# Altium PCB NB3000XN.PcbDoc (part 16 of 71)
Units mil, origin at the board's own origin, x right, y up, seen from the top; angles counter-clockwise.
Board outline 9527.56 x 6929.77 mil, 6 copper layers (Top Layer, GND+SHIELD, MidLayer1, MidLayer2, P2 - 3V3+5V0, Bottom Layer), stack 62.375 mil thick; 832 components, 1027 nets, 4655 pads, 4981 vias.
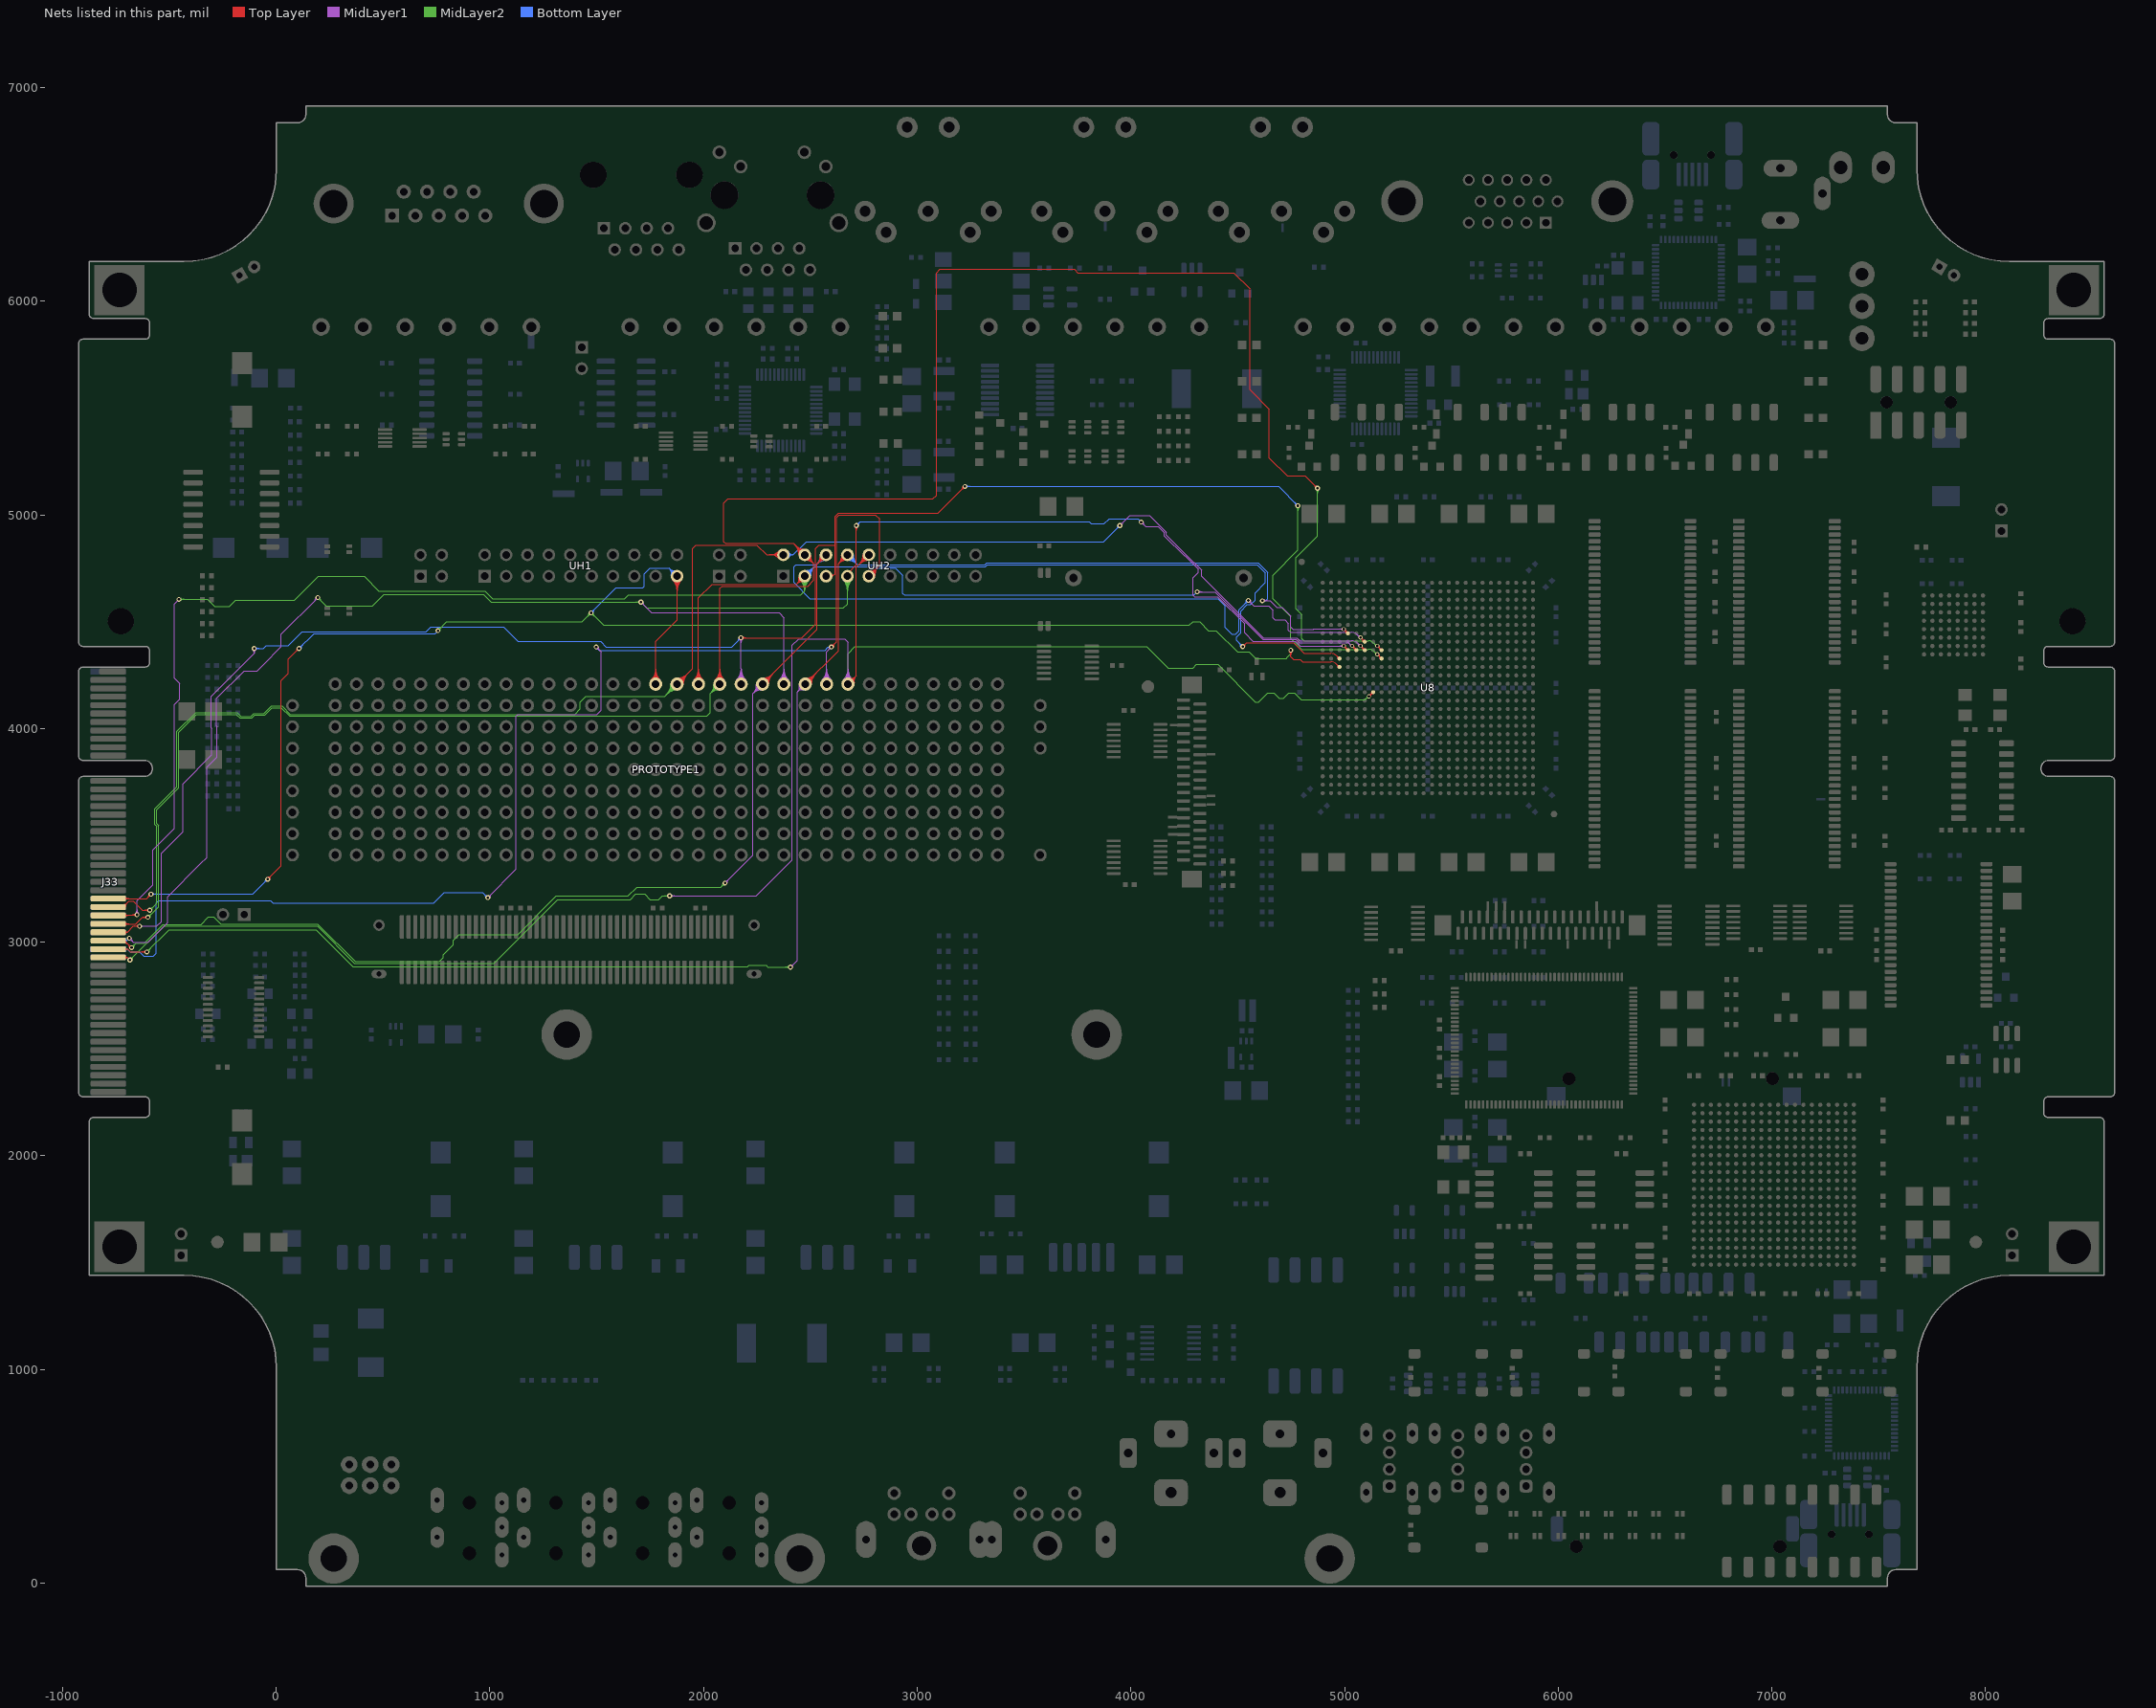
[diagram p20: the nets of this part, all layers, seen from the top]

## Via types
v1: diameter 23, hole 11.81, Top Layer to Bottom Layer, 3672 vias
v2: diameter 26, hole 11.81, Top Layer to Bottom Layer, 461 vias
v3: diameter 19, hole 11.81, Top Layer to Bottom Layer, tented both sides, 396 vias
v4: diameter 23.62, hole 11.81, Top Layer to Bottom Layer, 288 vias
v5: diameter 20, hole 11.81, Top Layer to Bottom Layer, 91 vias
v6: diameter 23, hole 11.81, Top Layer to Bottom Layer, tented both sides, 50 vias
v7: diameter 31, hole 11.81, Top Layer to Bottom Layer, 15 vias
v8: diameter 27.56, hole 11.81, Top Layer to Bottom Layer, tented both sides, 4 vias
v9: diameter 29, hole 11.81, Top Layer to Bottom Layer, 3 vias
v10: diameter 21, hole 11.81, Top Layer to Bottom Layer, 1 vias

## Nets (pads, with @x,y where several pads share a name; then routed paths per layer and width w, separated by ;. In a path a pad name is that pad's centre, name@x,y a point inside that pad or via, vN(x,y) a via of type N, cw(c..) or ccw(c..) an arc to the next point about the centre after c; other vN are vias at no path point) (continued)
ATE.UIO.IO17: J33.A26 PROTOTYPE1.H16 U8.L3 UH1.19 | length 9788.4
  Top Layer w4: J33.A26@-785.98,3204.04 -607.48,3204.04 v1(-586.48,3225.04) ; J33.A26@-711.58,3198.54 cw(c-698.3,3185.26) -698.3,3204.04 cw(c-698.3,3222.82) J33.A26@-711.58,3209.54 ; J33.A26@-708.76,3195.71 cw(c-688.65,3175.6) -688.65,3204.04 cw(c-688.65,3232.48) J33.A26@-708.76,3212.37 ; v1@-595.98,3225.04 cw(c-618.91,3225.04) -602.69,3208.82 cw(c-586.48,3192.61) v1@-586.48,3215.54 ; v1@-591.98,3225.04 cw(c-605.25,3225.04) -595.87,3215.65 cw(c-586.48,3206.26) v1@-586.48,3219.54 ; v1(-40,3295) 23.52,3358.52 23.52,4225.04 ; v1@-40,3300.5 ccw(c-40,3313.78) -30.61,3304.39 ccw(c-21.22,3295) v1@-34.5,3295 ; v1@-40,3304.5 ccw(c-40,3327.43) -23.78,3311.22 ccw(c-7.57,3295) v1@-30.5,3295 ; 43.96,4245.48 23.52,4225.04 ; v1@97.36,4375.04 cw(c74.42,4375.04) 90.64,4358.82 cw(c106.86,4342.61) v1@106.86,4365.54 ; v1@101.36,4375.04 cw(c88.08,4375.04) 97.47,4365.65 cw(c106.86,4356.26) v1@106.86,4369.54 ; v1(106.86,4375.04) 56.86,4325.04 56.86,4258.37 23.52,4225.04 ; PROTOTYPE1.H16@1755.62,4228.74 ccw(c1706.11,4278.25) 1776.12,4278.25 ccw(c1846.13,4278.25) PROTOTYPE1.H16@1796.63,4228.74 ; PROTOTYPE1.H16@1758.44,4225.91 ccw(c1715.77,4268.59) 1776.12,4268.59 ccw(c1836.48,4268.59) PROTOTYPE1.H16@1793.8,4225.91 ; PROTOTYPE1.H16@1761.27,4223.08 ccw(c1725.42,4258.93) 1776.12,4258.93 ccw(c1826.82,4258.93) PROTOTYPE1.H16@1790.97,4223.08 ; PROTOTYPE1.H16@1764.1,4220.26 ccw(c1735.08,4249.28) 1776.12,4249.28 ccw(c1817.16,4249.28) PROTOTYPE1.H16@1788.14,4220.26 ; PROTOTYPE1.H16@1766.93,4217.43 ccw(c1744.74,4239.62) 1776.12,4239.62 ccw(c1807.51,4239.62) PROTOTYPE1.H16@1785.31,4217.43 ; PROTOTYPE1.H16@1776.12,4208.23 1776.12,4408.37 1876.12,4508.37 UH1.19@1876.12,4713.23 ; UH1.19@1856.66,4693.77 cw(c1809.66,4646.78) 1876.12,4646.78 cw(c1942.58,4646.78) UH1.19@1895.59,4693.77 ; UH1.19@1859.48,4696.6 cw(c1819.32,4656.43) 1876.12,4656.43 cw(c1932.92,4656.43) UH1.19@1892.76,4696.6 ; UH1.19@1862.31,4699.43 cw(c1828.98,4666.09) 1876.12,4666.09 cw(c1923.26,4666.09) UH1.19@1889.93,4699.43 ; UH1.19@1865.14,4702.26 cw(c1838.63,4675.75) 1876.12,4675.75 cw(c1913.61,4675.75) UH1.19@1887.1,4702.26 ; v1@4741.81,4359.99 cw(c4725.59,4343.77) 4748.52,4343.77 cw(c4771.46,4343.77) v1@4755.24,4359.99 ; v1@4744.64,4362.82 cw(c4735.25,4353.43) 4748.52,4353.43 cw(c4761.8,4353.43) v1@4752.41,4362.82 ; v1@4755,4366.71 v1(4748.52,4366.71) 4748.52,4336.48 4761.6,4323.4 4792.92,4323.4 4804.03,4312.29 4809.42,4312.29 4823,4312.29 4855.26,4312.29 4860,4312.29 4870,4312.29 4936.73,4312.29 cw(c4936.73,4273.61) 4964.08,4300.96 ; U8.L3@4969.27,4288.43 ccw(c4951.55,4288.43) 4964.08,4300.96 ; U8.L3@4976.61,4295.77 cw(c4976.61,4313.49) 4964.08,4300.96
  MidLayer2 w4: v1(756.86,4458.37) 798.52,4500.04 1431.86,4500.04 v1(1473.52,4541.71) 1531.86,4483.37 4273.52,4483.37 4290.19,4500.04 4322.19,4500.04 4363.86,4458.37 4398.52,4458.37 4498.52,4358.37 4554.19,4358.37 4584.19,4328.37 4726.86,4328.37 4731.86,4333.37 4748.52,4350.04 ; v1@756.86,4463.87 ccw(c756.86,4477.15) 766.25,4467.76 ccw(c775.64,4458.37) v1@762.36,4458.37 ; v1@756.86,4467.87 ccw(c756.86,4490.81) 773.07,4474.59 ccw(c789.29,4458.37) v1@766.36,4458.37 ; v1@1464.02,4541.71 cw(c1441.09,4541.71) 1457.31,4525.49 cw(c1473.52,4509.27) 1473.52,4532.21 cw(c1473.52,4509.27) 1489.74,4525.49 cw(c1505.96,4541.71) v1@1483.02,4541.71 ; v1@1468.02,4541.71 cw(c1454.75,4541.71) 1464.14,4532.32 cw(c1473.52,4522.93) 1473.52,4536.21 cw(c1473.52,4522.93) 1482.91,4532.32 cw(c1492.3,4541.71) v1@1479.02,4541.71 ; v1@4743.68,4358.53 cw(c4738.65,4350.04) 4748.52,4350.04 ; v1(4748.52,4366.71) 4748.52,4350.04 ; v1@4753.36,4358.53 ccw(c4758.39,4350.04) 4748.52,4350.04
  Bottom Layer w4: v1(-586.48,3225.04) -109.96,3225.04 v1(-40,3295) ; v1@-582.59,3221.15 cw(c-573.2,3211.76) -573.2,3225.04 cw(c-573.2,3238.32) v1@-582.59,3228.93 ; v1@-579.76,3218.32 cw(c-563.54,3202.11) -563.54,3225.04 cw(c-563.54,3247.98) v1@-579.76,3231.76 ; v1@-49.5,3295 cw(c-72.44,3295) -56.22,3278.78 cw(c-40,3262.56) v1@-40,3285.5 ; v1@-45.5,3295 cw(c-58.78,3295) -49.39,3285.61 cw(c-40,3276.22) v1@-40,3289.5 ; v1(106.86,4375.04) 176.82,4445 743.48,4445 v1(756.86,4458.37) ; v1@106.86,4380.54 ccw(c106.86,4393.82) 116.25,4384.43 ccw(c125.64,4375.04) v1@112.36,4375.04 ; v1@106.86,4384.54 ccw(c106.86,4407.48) 123.07,4391.26 ccw(c139.29,4375.04) v1@116.36,4375.04 ; v1(1473.52,4541.71) 1590.19,4658.37 1715.19,4658.37 1723.52,4666.71 1723.52,4725.04 1748.52,4750.04 1831.86,4750.04 1839.32,4750.04 ; v1@1473.52,4547.21 ccw(c1473.52,4560.49) 1482.91,4551.1 ccw(c1492.3,4541.71) v1@1479.02,4541.71 ; v1@1473.52,4551.21 ccw(c1473.52,4574.14) 1489.74,4557.93 ccw(c1505.96,4541.71) v1@1483.02,4541.71 ; UH1.19@1849.08,4718.37 ccw(c1814.25,4724.98) 1839.32,4750.04 ; UH1.19@1853.01,4717.62 ccw(c1823.24,4723.27) 1844.66,4744.69 ccw(c1866.09,4766.11) UH1.19@1871.73,4736.35 ; UH1.19@1856.94,4716.88 ccw(c1832.23,4721.56) 1850.01,4739.34 ccw(c1867.79,4757.12) UH1.19@1872.48,4732.42 ; UH1.19@1870.99,4740.28 cw(c1864.38,4775.1) 1839.32,4750.04 ; UH1.19@1873.73,4715.62 1839.32,4750.04
ATE.UIO.IO18: J33.A27 PROTOTYPE1.H17 U8.J6 UH2.2 | length 9513.1
  Top Layer w4: J33.A27@-785.98,3164.67 -717.09,3164.67 -690.05,3191.71 -668.14,3191.71 -626.48,3150.04 v1(-591.81,3150.04) ; J33.A27@-717.08,3172.45 ccw(c-717.08,3191.23) -703.81,3177.95 ccw(c-690.52,3164.67) J33.A27@-709.3,3164.67 ; J33.A27@-717.08,3176.45 ccw(c-717.08,3204.89) -696.98,3184.78 ccw(c-676.86,3164.67) J33.A27@-705.3,3164.67 ; v1@-598.53,3143.32 ccw(c-614.74,3127.11) -614.74,3150.04 ccw(c-614.74,3172.98) v1@-598.53,3156.76 ; v1@-595.7,3146.15 ccw(c-605.09,3136.76) -605.09,3150.04 ccw(c-605.09,3163.32) v1@-595.7,3153.93 ; PROTOTYPE1.H17@1876.12,4208.23 1948.52,4280.64 1948.52,4841.71 1965.19,4858.37 2249.9,4858.37 2295.04,4813.23 UH2.2@2373.76,4813.23 ; PROTOTYPE1.H17@1876.12,4221.23 ccw(c1876.12,4252.62) 1898.31,4230.43 ccw(c1920.51,4208.23) PROTOTYPE1.H17@1889.12,4208.23 ; PROTOTYPE1.H17@1876.12,4225.23 ccw(c1876.12,4266.28) 1905.14,4237.26 ccw(c1934.16,4208.23) PROTOTYPE1.H17@1893.12,4208.23 ; PROTOTYPE1.H17@1876.12,4229.23 ccw(c1876.12,4279.93) 1911.97,4244.08 ccw(c1947.82,4208.23) PROTOTYPE1.H17@1897.12,4208.23 ; PROTOTYPE1.H17@1876.12,4233.23 ccw(c1876.12,4293.59) 1918.8,4250.91 ccw(c1961.48,4208.23) PROTOTYPE1.H17@1901.12,4208.23 ; PROTOTYPE1.H17@1876.12,4237.23 ccw(c1876.12,4307.25) 1925.63,4257.74 ccw(c1975.13,4208.23) PROTOTYPE1.H17@1905.12,4208.23 ; UH2.2@2354.29,4793.77 ccw(c2307.3,4746.78) 2307.3,4813.23 ccw(c2307.3,4879.69) UH2.2@2354.29,4832.7 ; UH2.2@2357.12,4796.6 ccw(c2316.96,4756.43) 2316.96,4813.23 ccw(c2316.96,4870.04) UH2.2@2357.12,4829.87 ; UH2.2@2359.95,4799.43 ccw(c2326.62,4766.09) 2326.62,4813.23 ccw(c2326.61,4860.38) UH2.2@2359.95,4827.04 ; UH2.2@2362.78,4802.25 ccw(c2336.27,4775.75) 2336.27,4813.23 ccw(c2336.27,4850.72) UH2.2@2362.78,4824.21 ; v3(5075.04,4386.85) U8.J6@5094.72,4367.17 ; U8.J6@5087.22,4367.17 ccw(c5069.12,4367.17) 5081.92,4379.97 ccw(c5094.72,4392.77) U8.J6@5094.72,4374.67 ; U8.J6@5087.38,4367.17 ccw(c5069.66,4367.17) 5082.19,4379.7 ccw(c5094.72,4392.23) U8.J6@5094.72,4374.51 ; 5087.84,4374.05 cw(c5100.65,4386.85) 5082.54,4386.85 ccw(c5100.65,4386.85) 5087.84,4374.05 ; 5087.84,4374.05 ccw(c5075.04,4361.24) 5075.04,4379.35 cw(c5075.04,4361.24) 5087.84,4374.05
  MidLayer1 w4: v1(3948.52,4950.04) 3990.19,4991.71 3996.29,4997.81 4087.38,4997.81 4165.69,4919.5 4165.69,4905.15 4254.29,4816.54 4256.42,4816.54 4331.86,4741.1 4331.86,4713.37 4620.19,4425.04 4776.24,4425.04 4790.56,4410.71 4815,4410.71 4860,4410.71 4870,4410.71 4918.62,4410.71 4938.04,4410.71 5012.16,4410.71 ; v1@3948.52,4955.54 ccw(c3948.52,4968.82) 3957.91,4959.43 ccw(c3967.3,4950.04) v1@3954.02,4950.04 ; v1@3948.52,4959.54 ccw(c3948.52,4982.48) 3964.74,4966.26 ccw(c3980.96,4950.04) v1@3958.02,4950.04 ; 4998.23,4410.71 5012.16,4410.71 ; v3@5067.57,4386.2 ccw(c5049.53,4384.62) 5061.17,4398.49 ; v3@5074.39,4394.32 cw(c5072.81,4412.36) 5061.17,4398.49 ; 5012.16,4410.71 5031.66,4410.71 cw(c5031.66,4368.98) 5061.17,4398.49
  MidLayer2 w4: v1(-591.81,3150.04) -559.81,3182.04 -559.81,3542.96 -568.31,3551.46 -568.31,3623.95 -465,3727.26 -465,3986.52 -376.48,4075.04 -183.81,4075.04 -167.14,4058.37 -166.27,4057.5 -117.35,4057.5 -104.35,4070.5 -57.02,4070.5 -22.52,4105 26.9,4105 65.19,4066.71 1398.52,4066.71 1423.52,4091.71 1423.52,4125.04 1448.52,4150.04 1817.93,4150.04 PROTOTYPE1.H17@1876.12,4208.23 ; v1@-591.81,3155.54 ccw(c-591.81,3168.82) -582.42,3159.43 ccw(c-573.03,3150.04) v1@-586.31,3150.04 ; v1@-591.81,3159.54 ccw(c-591.81,3182.48) -575.59,3166.26 ccw(c-559.37,3150.04) v1@-582.31,3150.04 ; PROTOTYPE1.H17@1847.12,4208.23 cw(c1777.11,4208.23) 1826.62,4158.73 cw(c1876.12,4109.22) PROTOTYPE1.H17@1876.12,4179.23 ; PROTOTYPE1.H17@1851.12,4208.23 cw(c1790.77,4208.23) 1833.44,4165.56 cw(c1876.12,4122.88) PROTOTYPE1.H17@1876.12,4183.23 ; PROTOTYPE1.H17@1855.12,4208.23 cw(c1804.42,4208.23) 1840.27,4172.39 cw(c1876.12,4136.54) PROTOTYPE1.H17@1876.12,4187.23 ; PROTOTYPE1.H17@1859.12,4208.23 cw(c1818.08,4208.23) 1847.1,4179.21 cw(c1876.12,4150.19) PROTOTYPE1.H17@1876.12,4191.23 ; PROTOTYPE1.H17@1863.12,4208.23 cw(c1831.74,4208.23) 1853.93,4186.04 cw(c1876.12,4163.85) PROTOTYPE1.H17@1876.12,4195.23
  Bottom Layer w4: UH2.2@2373.76,4813.23 2420.05,4813.23 2481.86,4875.04 3873.52,4875.04 v1(3948.52,4950.04) ; UH2.2@2390.92,4803.91 cw(c2406.6,4795.39) 2406.6,4813.23 cw(c2406.6,4831.08) UH2.2@2390.92,4822.56 ; UH2.2@2394.43,4802 cw(c2413.32,4791.73) 2413.32,4813.23 cw(c2413.32,4834.73) UH2.2@2394.43,4824.47 ; UH2.2@2397.95,4800.09 cw(c2420.05,4788.08) 2420.05,4813.23 cw(c2420.05,4838.39) UH2.2@2397.95,4826.38 ; v1@3939.02,4950.04 cw(c3916.09,4950.04) 3932.31,4933.82 cw(c3948.52,4917.61) v1@3948.52,4940.54 ; v1@3943.02,4950.04 cw(c3929.75,4950.04) 3939.14,4940.65 cw(c3948.52,4931.26) v1@3948.52,4944.54
ATE.UIO.IO19: J33.A28 PROTOTYPE1.H18 U8.K3 UH2.3 | length 10572.8
  Top Layer w4: J33.A28@-785.98,3125.3 -696.48,3125.3 ; J33.A28@-706.93,3119.32 cw(c-696.48,3113.16) -696.48,3125.3 ; J33.A28@-706.93,3131.28 ccw(c-696.48,3137.44) -696.48,3125.3 ; v1@-658.19,3121.66 ccw(c-674.41,3105.44) -674.41,3128.37 ccw(c-674.41,3151.31) v1@-658.19,3135.09 ; v1@-655.36,3124.49 ccw(c-664.75,3115.1) -664.75,3128.37 ccw(c-664.75,3141.65) v1@-655.36,3132.26 ; v1(-651.48,3128.37) -693.4,3128.37 -696.48,3125.3 ; PROTOTYPE1.H18@1955.62,4228.74 ccw(c1906.11,4278.25) 1976.12,4278.25 ccw(c2046.13,4278.25) PROTOTYPE1.H18@1996.63,4228.74 ; PROTOTYPE1.H18@1958.44,4225.91 ccw(c1915.77,4268.59) 1976.12,4268.59 ccw(c2036.48,4268.59) PROTOTYPE1.H18@1993.8,4225.91 ; PROTOTYPE1.H18@1961.27,4223.08 ccw(c1925.42,4258.93) 1976.12,4258.93 ccw(c2026.82,4258.93) PROTOTYPE1.H18@1990.97,4223.08 ; PROTOTYPE1.H18@1964.1,4220.26 ccw(c1935.08,4249.28) 1976.12,4249.28 ccw(c2017.16,4249.28) PROTOTYPE1.H18@1988.14,4220.26 ; PROTOTYPE1.H18@1966.93,4217.43 ccw(c1944.74,4239.62) 1976.12,4239.62 ccw(c2007.51,4239.62) PROTOTYPE1.H18@1985.31,4217.43 ; PROTOTYPE1.H18@1976.12,4208.23 1976.12,4611.12 2040.04,4675.04 2435.57,4675.04 ; UH2.3@2446.57,4708.92 cw(c2407.83,4702.78) 2435.57,4675.04 ; UH2.3@2450.52,4709.55 cw(c2417.41,4704.3) 2441.12,4680.59 cw(c2464.82,4656.89) UH2.3@2470.07,4690 ; UH2.3@2454.47,4710.17 cw(c2426.99,4705.82) 2446.67,4686.14 cw(c2466.34,4666.47) UH2.3@2470.7,4693.95 ; UH2.3@2458.42,4710.8 cw(c2436.57,4707.33) 2452.22,4691.69 cw(c2467.86,4676.05) UH2.3@2471.33,4697.9 ; UH2.3@2469.45,4686.05 ccw(c2463.3,4647.31) 2435.57,4675.04 ; UH2.3@2473.76,4713.23 2435.57,4675.04 ; v1(4523.52,4383.71) 4541.69,4401.87 4738,4401.87 4760.76,4401.87 4810.97,4351.66 4815.97,4351.66 4824,4351.66 4860,4351.66 ; v1@4523.52,4389.21 ccw(c4523.52,4402.49) 4532.91,4393.1 ccw(c4542.3,4383.71) v1@4529.02,4383.71 ; v1@4523.52,4393.21 ccw(c4523.52,4416.14) 4539.74,4399.93 ccw(c4555.96,4383.71) v1@4533.02,4383.71 ; 4856.86,4351.66 4855.26,4351.66 4860,4351.66 ; 4860,4351.66 4870,4351.66 4873.88,4351.66 4936.73,4351.66 ; 4936.73,4351.66 cw(c4936.73,4312.98) 4964.08,4340.33 ; 4936.73,4351.66 cw(c4936.73,4312.98) 4964.08,4340.33 ; 4964.08,4340.33 cw(c4951.55,4327.8) 4969.27,4327.8 ccw(c4951.55,4327.8) 4964.08,4340.33 ; 4964.08,4340.33 ccw(c4976.61,4352.86) 4976.61,4335.14 cw(c4976.61,4352.86) 4964.08,4340.33
  MidLayer1 w4: v1@-658.19,3135.09 ccw(c-674.41,3151.31) -651.48,3151.31 ccw(c-628.54,3151.31) v1@-644.76,3135.09 ; v1@-655.36,3132.26 ccw(c-664.75,3141.65) -651.48,3141.65 ccw(c-638.2,3141.65) v1@-647.59,3132.26 ; v1(-651.48,3128.37) -651.48,3195 -577,3269.48 -577,3432.85 -476.81,3533.04 -476.81,4113.26 -452,4138.06 -452,4211.93 -476.81,4236.74 -476.81,4583.19 v1(-455,4605)
  MidLayer2 w4: v1(-455,4605) -322.72,4605 -288.6,4570.87 -219.43,4570.87 -188.93,4601.37 86.63,4601.37 162.03,4676.78 197.25,4712 411.56,4712 479.75,4643.81 977.38,4643.81 1013.48,4607.71 1631.39,4607.71 1648.39,4624.71 2454.71,4624.71 2473.76,4643.76 UH2.3@2473.76,4713.23 ; v1@-451.11,4601.11 cw(c-441.72,4591.72) -441.72,4605 cw(c-441.72,4618.28) v1@-451.11,4608.89 ; v1@-448.28,4598.28 cw(c-432.07,4582.06) -432.07,4605 cw(c-432.07,4627.93) v1@-448.28,4611.72 ; UH2.3@2454.29,4693.77 cw(c2407.3,4646.78) 2473.76,4646.78 cw(c2540.22,4646.78) UH2.3@2493.22,4693.77 ; UH2.3@2457.12,4696.6 cw(c2416.96,4656.43) 2473.76,4656.43 cw(c2530.56,4656.43) UH2.3@2490.4,4696.6 ; UH2.3@2459.95,4699.43 cw(c2426.62,4666.09) 2473.76,4666.09 cw(c2520.9,4666.09) UH2.3@2487.57,4699.43 ; UH2.3@2462.78,4702.25 cw(c2436.27,4675.75) 2473.76,4675.75 cw(c2511.25,4675.75) UH2.3@2484.74,4702.25
  Bottom Layer w4: UH2.3@2474.21,4728.76 ccw(c2475.19,4762.73) 2499.22,4738.7 ccw(c2523.25,4714.66) UH2.3@2489.28,4713.68 ; UH2.3@2474.32,4732.75 ccw(c2475.56,4775.48) 2505.78,4745.25 ccw(c2536,4715.03) UH2.3@2493.28,4713.8 ; UH2.3@2474.44,4736.75 ccw(c2475.92,4788.23) 2512.34,4751.81 ccw(c2548.75,4715.4) UH2.3@2497.28,4713.91 ; UH2.3@2474.55,4740.75 ccw(c2476.29,4800.98) 2518.9,4758.37 ccw(c2561.5,4715.77) UH2.3@2501.27,4714.03 ; v1@4514.02,4383.71 ccw(c4491.09,4383.71) 4507.31,4399.93 ccw(c4523.52,4416.14) v1@4523.52,4393.21 ; v1@4518.02,4383.71 ccw(c4504.75,4383.71) 4514.14,4393.1 ccw(c4523.52,4402.49) v1@4523.52,4389.21 ; v1(4523.52,4383.71) 4495,4412.23 4495,4429.6 4514.86,4449.46 4514.86,4550 4544.86,4580 4560,4580 4581.86,4601.86 4581.86,4635 4630,4683.14 4630,4729.27 4591.56,4767.71 3329.02,4767.71 3319.69,4758.37 2518.9,4758.37 UH2.3@2490.19,4729.67 ; UH2.3@2490.19,4729.67 2490.19,4713.23 UH2.3@2473.76,4713.23 UH2.3@2490.19,4729.67
ATE.UIO.IO20: J33.A29 PROTOTYPE1.H19 U8.J8 UH2.4 | length 13015.3
  Top Layer w4: J33.A29@-785.98,3085.93 -657.25,3085.93 -626.48,3116.71 v1(-600.48,3116.71) ; J33.A29@-711.58,3080.43 cw(c-698.3,3067.15) -698.3,3085.93 cw(c-698.3,3104.71) J33.A29@-711.58,3091.43 ; J33.A29@-708.76,3077.6 cw(c-688.65,3057.49) -688.65,3085.93 cw(c-688.65,3114.37) J33.A29@-708.76,3094.26 ; v1@-607.19,3109.99 ccw(c-623.41,3093.77) -623.41,3116.71 ccw(c-623.41,3139.64) v1@-607.19,3123.43 ; v1@-604.36,3112.82 ccw(c-613.75,3103.43) -613.75,3116.71 ccw(c-613.75,3129.99) v1@-604.36,3120.6 ; PROTOTYPE1.H19@2055.62,4228.74 ccw(c2006.11,4278.25) 2076.12,4278.25 ccw(c2146.13,4278.25) PROTOTYPE1.H19@2096.63,4228.74 ; PROTOTYPE1.H19@2058.44,4225.91 ccw(c2015.77,4268.59) 2076.12,4268.59 ccw(c2136.48,4268.59) PROTOTYPE1.H19@2093.8,4225.91 ; PROTOTYPE1.H19@2061.27,4223.08 ccw(c2025.42,4258.93) 2076.12,4258.93 ccw(c2126.82,4258.93) PROTOTYPE1.H19@2090.97,4223.08 ; PROTOTYPE1.H19@2064.1,4220.26 ccw(c2035.08,4249.28) 2076.12,4249.28 ccw(c2117.16,4249.28) PROTOTYPE1.H19@2088.14,4220.26 ; PROTOTYPE1.H19@2066.93,4217.43 ccw(c2044.74,4239.62) 2076.12,4239.62 ccw(c2107.51,4239.62) PROTOTYPE1.H19@2085.31,4217.43 ; PROTOTYPE1.H19@2076.12,4208.23 2076.12,4656.12 2086.71,4666.71 2487.86,4666.71 2515.19,4694.04 2515.19,4771.8 ; UH2.4@2446.23,4813.23 ccw(c2379.77,4813.23) 2426.77,4860.23 ccw(c2473.76,4907.22) UH2.4@2473.76,4840.76 ; UH2.4@2450.23,4813.23 ccw(c2393.43,4813.23) 2433.59,4853.4 ccw(c2473.76,4893.56) UH2.4@2473.76,4836.76 ; UH2.4@2454.23,4813.23 ccw(c2407.09,4813.23) 2440.42,4846.57 ccw(c2473.76,4879.91) UH2.4@2473.76,4832.76 ; UH2.4@2458.23,4813.23 ccw(c2420.74,4813.23) 2447.25,4839.74 ccw(c2473.76,4866.25) UH2.4@2473.76,4828.76 ; UH2.4@2475.2,4797.77 cw(c2477.75,4770.48) 2497.13,4789.86 cw(c2516.51,4809.25) UH2.4@2489.22,4811.79 ; UH2.4@2475.57,4793.79 cw(c2478.78,4759.47) 2503.15,4783.84 cw(c2527.52,4808.22) UH2.4@2493.2,4811.42 ; UH2.4@2475.94,4789.81 cw(c2479.8,4748.46) 2509.17,4777.82 cw(c2538.53,4807.19) UH2.4@2497.18,4811.05 ; UH2.4@2476.32,4785.83 cw(c2480.83,4737.45) 2515.19,4771.8 ; UH2.4@2501.17,4810.68 ccw(c2549.55,4806.16) 2515.19,4771.8 ; v1@4864.02,5125.04 ccw(c4841.09,5125.04) 4857.31,5141.26 ccw(c4873.52,5157.48) v1@4873.52,5134.54 ; v1@4868.02,5125.04 ccw(c4854.75,5125.04) 4864.14,5134.43 ccw(c4873.52,5143.82) v1@4873.52,5130.54 ; v1(4873.52,5125.04) 4815.19,5183.37 4731.86,5183.37 4648.19,5267.04 4648.19,5495.02 4556.86,5586.36 4556.86,6058.37 4481.86,6133.37 3751.67,6133.37 3735,6150.04 3106.86,6150.04 3090.19,6133.37 3090.19,5091.71 3073.48,5075 2115,5075 2095,5055 2095,4875 2103.29,4866.71 2420.29,4866.71 UH2.4@2473.41,4813.58 ; v3(5153.78,4386.85) U8.J8@5173.46,4367.17 ; U8.J8@5165.96,4367.17 ccw(c5147.86,4367.17) 5160.66,4379.97 ccw(c5173.46,4392.77) U8.J8@5173.46,4374.67 ; U8.J8@5166.12,4367.17 ccw(c5148.4,4367.17) 5160.93,4379.7 ccw(c5173.46,4392.23) U8.J8@5173.46,4374.51 ; UH2.4@2473.41,4813.58 UH2.4@2473.76,4813.23 ; UH2.4@2473.41,4813.58 UH2.4@2473.76,4813.23 ; UH2.4@2473.76,4813.23 2515.19,4771.8 ; 5166.58,4374.05 cw(c5179.39,4386.85) 5161.28,4386.85 ccw(c5179.39,4386.85) 5166.58,4374.05 ; 5166.58,4374.05 ccw(c5153.78,4361.24) 5153.78,4379.35 cw(c5153.78,4361.24) 5166.58,4374.05
  MidLayer2 w4: v1@-600.48,3122.21 ccw(c-600.48,3137.09) -589.95,3126.57 ; v1@-600.48,3126.21 ccw(c-600.48,3150.75) -583.12,3133.4 ; v1@-599.81,3116.71 -551.48,3165.04 -551.48,3545.94 -560.31,3554.78 -560.31,3620.64 -457,3723.95 -457,3983.2 -373.5,4066.71 -186.79,4066.71 -169.58,4049.5 -114.04,4049.5 -101.04,4062.5 -96.35,4062.5 -95,4062.5 -53.7,4062.5 -19.2,4097 23.58,4097 62.21,4058.37 2015.19,4058.37 2031.86,4075.04 2031.86,4163.97 ; v1@-594.98,3116.71 cw(c-583.31,3116.71) -591.56,3124.96 ; v1@-590.98,3116.71 cw(c-569.65,3116.71) -584.73,3131.79 ; PROTOTYPE1.H19@2047.22,4205.85 cw(c1994.34,4201.49) 2031.86,4163.97 ; PROTOTYPE1.H19@2051.21,4206.18 cw(c2005.62,4202.42) 2037.96,4170.08 cw(c2070.31,4137.74) PROTOTYPE1.H19@2074.07,4183.32 ; PROTOTYPE1.H19@2055.19,4206.51 cw(c2016.9,4203.35) 2044.07,4176.18 cw(c2071.24,4149.02) PROTOTYPE1.H19@2074.39,4187.31 ; PROTOTYPE1.H19@2059.18,4206.84 cw(c2028.18,4204.28) 2050.17,4182.29 cw(c2072.17,4160.3) PROTOTYPE1.H19@2074.72,4191.29 ; PROTOTYPE1.H19@2073.74,4179.33 ccw(c2069.37,4126.46) 2031.86,4163.97 ; PROTOTYPE1.H19@2076.12,4208.23 2031.86,4163.97 ; v1@4866.81,5118.32 cw(c4850.59,5102.11) 4873.52,5102.11 cw(c4896.46,5102.11) v1@4880.24,5118.32 ; v1@4869.64,5121.15 cw(c4860.25,5111.76) 4873.52,5111.76 cw(c4886.8,5111.76) v1@4877.41,5121.15 ; v1(4873.52,5125.04) 4873.52,4900.04 4773.52,4800.04 4773.52,4559.69 4800,4533.21 4800,4421.31 4810.6,4410.71 4860,4410.71 4870,4410.71 4997.36,4410.71 5016.78,4410.71 5090.9,4410.71 5114.15,4410.71 cw(c5114.15,4386.94) 5130.37,4404.32 5138.95,4397.24 ; v3@5146.39,4385.55 ccw(c5128.56,4382.4) 5138.95,4397.24 ; v3@5152.48,4394.24 cw(c5149.33,4412.07) 5138.95,4397.24
ATE.UIO.IO21: J33.A30 PROTOTYPE1.H20 U8.K8 UH2.5 | length 10026.4
  Top Layer w4: J33.A30@-785.98,3046.56 -696.62,3046.56 ; J33.A30@-706.9,3040.65 cw(c-696.62,3034.68) -696.62,3046.56 ; J33.A30@-706.9,3052.48 ccw(c-696.62,3058.44) -696.62,3046.56 ; v1@-646.19,3068.32 ccw(c-662.41,3052.11) -662.41,3075.04 ccw(c-662.41,3097.98) v1@-646.19,3081.76 ; v1@-643.36,3071.15 ccw(c-652.75,3061.76) -652.75,3075.04 ccw(c-652.75,3088.32) v1@-643.36,3078.93 ; v1(-639.48,3075.04) -668.14,3075.04 -696.62,3046.56 ; v1(2175,4425.04) 2460.04,4425.04 2523.52,4488.52 2523.52,4841.71 2540.19,4858.37 2615.19,4858.37 ; v1@2178.89,4421.15 cw(c2188.28,4411.76) 2188.28,4425.04 cw(c2188.28,4438.32) v1@2178.89,4428.93 ; v1@2181.72,4418.32 cw(c2197.93,4402.11) 2197.93,4425.04 cw(c2197.93,4447.98) v1@2181.72,4431.76 ; UH2.5@2573.76,4713.23 2573.76,4716.71 2606.86,4716.71 ; UH2.5@2599.94,4721.73 ccw(c2606.86,4723.98) 2606.86,4716.71 ; UH2.5@2601.23,4711.44 cw(c2606.86,4711.07) 2606.86,4716.71 ; v1@3214.02,5133.37 cw(c3191.09,5133.37) 3207.31,5117.16 cw(c3223.52,5100.94) v1@3223.52,5123.87 ; v1@3218.02,5133.37 cw(c3204.75,5133.37) 3214.14,5123.99 cw(c3223.52,5114.6) v1@3223.52,5127.87 ; v1(3223.52,5133.37) 3098.52,5008.37 2631.86,5008.37 2615.19,4991.71 2615.19,4858.37 ; v3(5153.78,4347.48) U8.K8@5173.46,4327.8 ; U8.K8@5165.96,4327.8 ccw(c5147.86,4327.8) 5160.66,4340.6 ccw(c5173.46,4353.4) U8.K8@5173.46,4335.3 ; U8.K8@5166.12,4327.8 ccw(c5148.4,4327.8) 5160.93,4340.33 ccw(c5173.46,4352.86) U8.K8@5173.46,4335.14 ; 2606.86,4716.71 2615.19,4725.04 2615.19,4858.37 ; 5166.58,4334.68 cw(c5179.39,4347.48) 5161.28,4347.48 ccw(c5179.39,4347.48) 5166.58,4334.68 ; 5166.58,4334.68 ccw(c5153.78,4321.87) 5153.78,4339.98 cw(c5153.78,4321.87) 5166.58,4334.68
  MidLayer1 w4: v1(-639.48,3075.04) -558.65,3075.04 -537,3096.69 -537,3204.51 -536.98,3416.31 -436.81,3516.47 -436.81,3741.13 -301.23,3876.71 -301.23,4000.15 -303,4001.92 -303,4151.5 -102.81,4351.69 v1(-102.81,4375.04) ; v1@-109.53,4368.32 cw(c-125.74,4352.11) -102.81,4352.11 cw(c-79.87,4352.11) v1@-96.09,4368.32 ; v1@-106.7,4371.15 cw(c-116.09,4361.76) -102.81,4361.76 cw(c-89.53,4361.76) v1@-98.92,4371.15 ; PROTOTYPE1.H20@2155.62,4228.74 ccw(c2106.11,4278.25) 2176.12,4278.25 ccw(c2246.13,4278.25) PROTOTYPE1.H20@2196.63,4228.74 ; PROTOTYPE1.H20@2158.44,4225.91 ccw(c2115.77,4268.59) 2176.12,4268.59 ccw(c2236.48,4268.59) PROTOTYPE1.H20@2193.8,4225.91 ; PROTOTYPE1.H20@2161.27,4223.08 ccw(c2125.42,4258.93) 2176.12,4258.93 ccw(c2226.82,4258.93) PROTOTYPE1.H20@2190.97,4223.08 ; PROTOTYPE1.H20@2164.1,4220.26 ccw(c2135.08,4249.28) 2176.12,4249.28 ccw(c2217.16,4249.28) PROTOTYPE1.H20@2188.14,4220.26 ; PROTOTYPE1.H20@2166.93,4217.43 ccw(c2144.74,4239.62) 2176.12,4239.62 ccw(c2207.51,4239.62) PROTOTYPE1.H20@2185.31,4217.43 ; v1@2168.28,4418.32 cw(c2152.06,4402.11) 2175,4402.11 cw(c2197.93,4402.11) v1@2181.72,4418.32 ; v1@2171.11,4421.15 cw(c2161.72,4411.76) 2175,4411.76 cw(c2188.28,4411.76) v1@2178.89,4421.15 ; v1(2175,4425.04) 2175,4281.12 2176.12,4280 PROTOTYPE1.H20@2176.12,4208.23
  MidLayer2 w4: v1@4775.14,5036.32 cw(c4758.92,5020.11) 4781.86,5020.11 cw(c4804.79,5020.11) v1@4788.57,5036.32 ; v1@4777.97,5039.15 cw(c4768.58,5029.76) 4781.86,5029.76 cw(c4795.14,5029.76) v1@4785.75,5039.15 ; v1(4781.86,5043.04) 4781.86,4835.75 4664.19,4718.08 4664.19,4608.37 4748.52,4524.04 4748.52,4422.67 4799.85,4371.34 4840,4371.34 4860,4371.34 4870,4371.34 4997.36,4371.34 5016.78,4371.34 5090.9,4371.34 5110.4,4371.34 cw(c5110.4,4329.61) 5139.91,4359.12 ; v3@5146.31,4346.83 ccw(c5128.27,4345.25) 5139.91,4359.12 ; v3@5153.13,4354.95 cw(c5151.55,4372.99) 5139.91,4359.12
  Bottom Layer w4: v1(-102.81,4375.04) -60,4375.04 -46.04,4389 56.63,4389 80.34,4412.72 120.63,4453 700.63,4453 724.19,4476.56 1063.67,4476.56 1089.76,4450.48 1115.19,4425.04 1132.19,4408.04 1518.31,4408.04 1543.98,4382.37 2132.33,4382.37 v1(2175,4425.04) ; v1@-98.92,4371.15 cw(c-89.53,4361.76) -89.53,4375.04 cw(c-89.53,4388.32) v1@-98.92,4378.93 ; v1@-96.09,4368.32 cw(c-79.87,4352.11) -79.87,4375.04 cw(c-79.87,4397.98) v1@-96.09,4381.76 ; v1@2165.5,4425.04 cw(c2142.56,4425.04) 2158.78,4408.82 cw(c2175,4392.61) v1@2175,4415.54 ; v1@2169.5,4425.04 cw(c2156.22,4425.04) 2165.61,4415.65 cw(c2175,4406.26) v1@2175,4419.54 ; v1(3223.52,5133.37) 4691.52,5133.37 v1(4781.86,5043.04) ; v1@3227.41,5129.49 cw(c3236.8,5120.1) 3236.8,5133.37 cw(c3236.8,5146.65) v1@3227.41,5137.26 ; v1@3230.24,5126.66 cw(c3246.46,5110.44) 3246.46,5133.37 cw(c3246.46,5156.31) v1@3230.24,5140.09 ; v1@4772.36,5043.04 ccw(c4749.42,5043.04) 4765.64,5059.26 ccw(c4781.86,5075.48) v1@4781.86,5052.54 ; v1@4776.36,5043.04 ccw(c4763.08,5043.04) 4772.47,5052.43 ccw(c4781.86,5061.82) v1@4781.86,5048.54
ATE.UIO.IO22: J33.A31 PROTOTYPE1.H21 U8.H6 UH2.6 | length 10136.4
  Top Layer w4: J33.A31@-785.98,3007.19 -770,3007.19 -767.19,3010 -712.77,3010 v1(-677.14,2974.37) ; J33.A31@-717.08,2995.41 cw(c-717.08,2949.77) v1@-684.81,2982.05 ; J33.A31@-717.08,2999.41 cw(c-717.08,2963.43) -691.64,2988.87 ; J33.A31@-717.08,3003.41 cw(c-717.08,2977.09) -698.47,2995.7 ; J33.A31@-705.3,3007.19 ccw(c-694.07,3007.19) -702.01,2999.25 ; v1@-686.64,2974.37 ccw(c-709.58,2974.37) -693.36,2990.59 ccw(c-677.14,3006.81) v1@-677.14,2983.87 ; v1@-682.64,2974.37 ccw(c-695.92,2974.37) -686.53,2983.76 ccw(c-677.14,2993.15) v1@-677.14,2979.87 ; PROTOTYPE1.H21@2276.12,4208.23 2531.86,4463.97 2531.86,4771.33 ; PROTOTYPE1.H21@2276.12,4221.23 ccw(c2276.12,4252.62) 2298.31,4230.43 ccw(c2320.51,4208.23) PROTOTYPE1.H21@2289.12,4208.23 ; PROTOTYPE1.H21@2276.12,4225.23 ccw(c2276.12,4266.28) 2305.14,4237.26 ccw(c2334.16,4208.23) PROTOTYPE1.H21@2293.12,4208.23 ; PROTOTYPE1.H21@2276.12,4229.23 ccw(c2276.12,4279.93) 2311.97,4244.08 ccw(c2347.82,4208.23) PROTOTYPE1.H21@2297.12,4208.23 ; PROTOTYPE1.H21@2276.12,4233.23 ccw(c2276.12,4293.59) 2318.8,4250.91 ccw(c2361.48,4208.23) PROTOTYPE1.H21@2301.12,4208.23 ; PROTOTYPE1.H21@2276.12,4237.23 ccw(c2276.12,4307.25) 2325.63,4257.74 ccw(c2375.13,4208.23) PROTOTYPE1.H21@2305.12,4208.23 ; UH2.6@2546.33,4810.91 cw(c2496.5,4806.7) 2531.86,4771.33 ; UH2.6@2550.31,4811.25 cw(c2507.72,4807.65) 2537.95,4777.42 cw(c2568.17,4747.2) UH2.6@2571.78,4789.79 ; UH2.6@2554.3,4811.59 cw(c2518.95,4808.6) 2544.04,4783.51 cw(c2569.12,4758.42) UH2.6@2572.11,4793.78 ; UH2.6@2558.29,4811.93 cw(c2530.18,4809.55) 2550.12,4789.6 cw(c2570.07,4769.65) UH2.6@2572.45,4797.76 ; UH2.6@2571.44,4785.8 ccw(c2567.22,4735.97) 2531.86,4771.33 ; UH2.6@2573.76,4813.23 2531.86,4771.33 ; v3(5075.04,4426.22) U8.H6@5094.72,4406.54 ; U8.H6@5087.22,4406.54 ccw(c5069.12,4406.54) 5081.92,4419.34 ccw(c5094.72,4432.14) U8.H6@5094.72,4414.04 ; U8.H6@5087.38,4406.54 ccw(c5069.66,4406.54) 5082.19,4419.07 ccw(c5094.72,4431.6) U8.H6@5094.72,4413.88 ; 5087.84,4413.42 cw(c5100.65,4426.22) 5082.54,4426.22 ccw(c5100.65,4426.22) 5087.84,4413.42 ; 5087.84,4413.42 ccw(c5075.04,4400.61) 5075.04,4418.72 cw(c5075.04,4400.61) 5087.84,4413.42
  MidLayer1 w4: v1(2100.52,3277.04) 2231.86,3408.37 2231.86,4163.97 ; v1@2100.52,3282.54 ccw(c2100.52,3295.82) 2109.91,3286.43 ccw(c2119.3,3277.04) v1@2106.02,3277.04 ; v1@2100.52,3286.54 ccw(c2100.52,3309.48) 2116.74,3293.26 ccw(c2132.96,3277.04) v1@2110.02,3277.04 ; PROTOTYPE1.H21@2247.22,4205.85 cw(c2194.34,4201.49) 2231.86,4163.97 ; PROTOTYPE1.H21@2251.21,4206.18 cw(c2205.62,4202.42) 2237.96,4170.08 cw(c2270.31,4137.74) PROTOTYPE1.H21@2274.07,4183.32 ; PROTOTYPE1.H21@2255.19,4206.51 cw(c2216.9,4203.35) 2244.07,4176.18 cw(c2271.24,4149.02) PROTOTYPE1.H21@2274.39,4187.31 ; PROTOTYPE1.H21@2259.18,4206.84 cw(c2228.18,4204.28) 2250.17,4182.29 cw(c2272.17,4160.3) PROTOTYPE1.H21@2274.72,4191.29 ; PROTOTYPE1.H21@2273.74,4179.33 ccw(c2269.37,4126.46) 2231.86,4163.97 ; PROTOTYPE1.H21@2276.12,4208.23 2231.86,4163.97 ; v1@4546.86,4601.71 v1@4549.28,4599.28 ; v1@4550,4590.5 cw(c4550,4567.56) 4566.22,4583.78 cw(c4582.43,4600) v1@4559.5,4600 ; v1@4550,4594.5 cw(c4550,4581.22) 4559.39,4590.61 cw(c4568.78,4600) v1@4555.5,4600 ; v1(4550,4600) 4575,4575 4645,4575 4665,4555 4665,4518.37 4675,4508.37 4721.19,4508.37 4737.86,4491.71 4737.86,4459.71 4747.48,4450.08 4855.26,4450.08 4860,4450.08 4870,4450.08 4918.62,4450.08 4938.04,4450.08 5012.16,4450.08 ; 4998.23,4450.08 5012.16,4450.08 ; v3@5067.57,4425.57 ccw(c5049.53,4423.99) 5061.17,4437.86 ; v3@5074.39,4433.69 cw(c5072.81,4451.73) 5061.17,4437.86 ; 5012.16,4450.08 5031.66,4450.08 cw(c5031.66,4408.35) 5061.17,4437.86
  MidLayer2 w4: v1(-677.14,2974.37) -656.36,2995.16 -617.67,2995.16 -529.79,3083.04 -351.96,3083.04 -316.67,3118.33 -293.33,3118.33 -260,3085 193.94,3085 368.94,2910 765,2910 782.36,2927.36 782.36,2941.46 829.82,2988.93 829.82,3009.82 855,3035 1130.5,3035 1311.54,3216.04 1646.04,3216.04 1688.37,3258.37 2081.86,3258.37 v1(2100.52,3277.04) ; v1@-677.14,2979.87 ccw(c-677.14,2993.15) -667.75,2983.76 ccw(c-658.36,2974.37) v1@-671.64,2974.37 ; v1@-677.14,2983.87 ccw(c-677.14,3006.81) -660.93,2990.59 ccw(c-644.71,2974.37) v1@-667.64,2974.37 ; v1@2091.02,3277.04 cw(c2068.09,3277.04) 2084.31,3260.82 cw(c2100.52,3244.61) v1@2100.52,3267.54 ; v1@2095.02,3277.04 cw(c2081.75,3277.04) 2091.13,3267.65 cw(c2100.52,3258.26) v1@2100.52,3271.54
  Bottom Layer w4: 2431.37,4765 2430,4765 2423.19,4758.19 2423.19,4683.12 2497.94,4608.37 4406.86,4608.37 4440.19,4575.04 4440.19,4473.71 4472.19,4441.71 4490.19,4441.71 4506.86,4458.37 4506.86,4556.86 v1(4550,4600) ; 2431.37,4766.37 2526.9,4766.37 ; UH2.6@2546.23,4813.18 cw(c2480.24,4813.04) 2526.9,4766.38 ; UH2.6@2550.23,4813.19 cw(c2493.83,4813.07) 2533.71,4773.19 cw(c2573.6,4733.3) UH2.6@2573.71,4789.71 ; UH2.6@2554.23,4813.19 cw(c2507.42,4813.1) 2540.52,4779.99 cw(c2573.62,4746.89) UH2.6@2573.72,4793.71 ; UH2.6@2558.23,4813.2 cw(c2521.01,4813.13) 2547.33,4786.8 cw(c2573.65,4760.48) UH2.6@2573.73,4797.71 ; UH2.6@2573.7,4785.71 ccw(c2573.57,4719.71) 2526.9,4766.38 ; UH2.6@2573.76,4813.23 2526.9,4766.37 ; v1@4540.5,4600 cw(c4517.56,4600) 4533.78,4583.78 cw(c4550,4567.56) v1@4550,4590.5 ; v1@4544.5,4600 cw(c4531.22,4600) 4540.61,4590.61 cw(c4550,4581.22) v1@4550,4594.5
ATE.UIO.IO23: J33.B31 PROTOTYPE1.H22 U8.J4 UH2.7 | length 10243.9
  Top Layer w4: UH2.7@2673.76,4713.23 2673.76,4716.71 2673.52,4716.71 2673.52,4725.04 2715.19,4766.71 v1(2715.19,4950.04) ; v1@2708.47,4943.32 cw(c2692.26,4927.11) 2715.19,4927.11 cw(c2738.13,4927.11) v1@2721.91,4943.32 ; v1@2711.3,4946.15 cw(c2701.91,4936.76) 2715.19,4936.76 cw(c2728.47,4936.76) v1@2719.08,4946.15 ; v3(4996.3,4386.85) U8.J4@5015.98,4367.17 ; U8.J4@5008.48,4367.17 ccw(c4990.38,4367.17) 5003.18,4379.97 ccw(c5015.98,4392.77) U8.J4@5015.98,4374.67 ; U8.J4@5008.64,4367.17 ccw(c4990.92,4367.17) 5003.45,4379.7 ccw(c5015.98,4392.23) U8.J4@5015.98,4374.51 ; 5009.1,4374.05 cw(c5021.91,4386.85) 5003.8,4386.85 ccw(c5021.91,4386.85) 5009.1,4374.05 ; 5009.1,4374.05 ccw(c4996.3,4361.24) 4996.3,4379.35 cw(c4996.3,4361.24) 5009.1,4374.05
  MidLayer1 w4: v1@-687.48,3009.54 cw(c-687.48,2986.61) -671.26,3002.82 cw(c-655.04,3019.04) v1@-677.98,3019.04 ; v1@-687.48,3013.54 cw(c-687.48,3000.26) -678.09,3009.65 cw(c-668.7,3019.04) v1@-681.98,3019.04 ; v1(-687.48,3019.04) -668.48,3000.04 -599.7,3000.04 -513,3086.75 -513,3087 -507.5,3092.5 -507.5,3213.51 -352.74,3368.26 -324,3397.01 -324,3820 -277.23,3866.77 -277.23,4010.09 -279,4011.86 -279,4141.56 -150.56,4270 -89.85,4270 -60.92,4298.93 23.52,4383.37 23.52,4441.71 v1(194.86,4613.04) ; v1@185.36,4613.04 cw(c162.42,4613.04) 178.64,4596.82 cw(c194.86,4580.61) v1@194.86,4603.54 ; v1@189.36,4613.04 cw(c176.08,4613.04) 185.47,4603.65 cw(c194.86,4594.26) v1@194.86,4607.54 ; v1@1706.86,4582.21 cw(c1706.86,4559.27) 1723.07,4575.49 cw(c1739.29,4591.71) v1@1716.36,4591.71 ; v1@1706.86,4586.21 cw(c1706.86,4572.93) 1716.25,4582.32 cw(c1725.64,4591.71) v1@1712.36,4591.71 ; v1(1706.86,4591.71) 1756.86,4541.71 2353.29,4541.71 2376.12,4518.88 PROTOTYPE1.H22@2376.12,4208.23 ; PROTOTYPE1.H22@2355.62,4228.74 ccw(c2306.11,4278.25) 2376.12,4278.25 ccw(c2446.13,4278.25) PROTOTYPE1.H22@2396.63,4228.74 ; PROTOTYPE1.H22@2358.44,4225.91 ccw(c2315.77,4268.59) 2376.12,4268.59 ccw(c2436.48,4268.59) PROTOTYPE1.H22@2393.8,4225.91 ; PROTOTYPE1.H22@2361.27,4223.08 ccw(c2325.42,4258.93) 2376.12,4258.93 ccw(c2426.82,4258.93) PROTOTYPE1.H22@2390.97,4223.08 ; PROTOTYPE1.H22@2364.1,4220.26 ccw(c2335.08,4249.28) 2376.12,4249.28 ccw(c2417.16,4249.28) PROTOTYPE1.H22@2388.14,4220.26 ; PROTOTYPE1.H22@2366.93,4217.43 ccw(c2344.74,4239.62) 2376.12,4239.62 ccw(c2407.51,4239.62) PROTOTYPE1.H22@2385.31,4217.43 ; v1@4048.52,4957.21 cw(c4048.52,4934.27) 4064.74,4950.49 cw(c4080.96,4966.71) v1@4058.02,4966.71 ; v1@4048.52,4961.21 cw(c4048.52,4947.93) 4057.91,4957.32 cw(c4067.3,4966.71) v1@4054.02,4966.71 ; v1(4048.52,4966.71) 4069.53,4945.7 4128.17,4945.7 4157.69,4916.18 4157.69,4901.83 4250.98,4808.54 4253.11,4808.54 4315.19,4746.46 4315.19,4731.71 4290.19,4706.71 4290.19,4625.04 4298.52,4616.71 4405.9,4616.71 4532.5,4490.1 4532.5,4447.75 4571.54,4408.71 4769.94,4408.71 4791.8,4386.85 4860,4386.85 4870,4386.85 4918.62,4386.85 v3(4996.3,4386.85) ; v3@4991,4381.55 ccw(c4978.19,4368.74) 4978.19,4386.85 ccw(c4978.19,4404.96) v3@4991,4392.15 ; v3@4991.11,4381.66 ccw(c4978.57,4369.12) 4978.57,4386.85 ccw(c4978.57,4404.58) v3@4991.11,4392.04
  MidLayer2 w4: v1@194.86,4603.54 cw(c194.86,4580.61) 211.07,4596.82 cw(c227.29,4613.04) v1@204.36,4613.04 ; v1@194.86,4607.54 cw(c194.86,4594.26) 204.25,4603.65 cw(c213.64,4613.04) v1@200.36,4613.04 ; v1(194.86,4613.04) 233.86,4574.04 451.69,4574.04 505.46,4627.81 970.75,4627.81 1006.86,4591.71 v1(1706.86,4591.71) 1734.56,4564 2654,4564 2673.76,4583.76 UH2.7@2673.76,4713.23 ; v1@1700.14,4584.99 ccw(c1683.92,4568.77) 1683.92,4591.71 ccw(c1683.92,4614.64) v1@1700.14,4598.43 ; v1@1702.97,4587.82 ccw(c1693.58,4578.43) 1693.58,4591.71 ccw(c1693.58,4604.99) v1@1702.97,4595.6 ; v1@1706.86,4582.21 cw(c1706.86,4559.27) 1723.07,4575.49 cw(c1739.29,4591.71) v1@1716.36,4591.71 ; v1@1706.86,4586.21 cw(c1706.86,4572.93) 1716.25,4582.32 cw(c1725.64,4591.71) v1@1712.36,4591.71 ; UH2.7@2654.29,4693.77 cw(c2607.3,4646.78) 2673.76,4646.78 cw(c2740.22,4646.78) UH2.7@2693.22,4693.77 ; UH2.7@2657.12,4696.6 cw(c2616.96,4656.43) 2673.76,4656.43 cw(c2730.56,4656.43) UH2.7@2690.4,4696.6 ; UH2.7@2659.95,4699.43 cw(c2626.62,4666.09) 2673.76,4666.09 cw(c2720.9,4666.09) UH2.7@2687.57,4699.43 ; UH2.7@2662.78,4702.25 cw(c2636.27,4675.75) 2673.76,4675.75 cw(c2711.25,4675.75) UH2.7@2684.74,4702.25
  Bottom Layer w4: J33.B31@-766.3,3007.19 -699.33,3007.19 ; J33.B31@-706.23,3002.61 cw(c-699.33,2999.7) -699.33,3007.19 ; J33.B31@-706.23,3011.77 ccw(c-699.33,3014.69) -699.33,3007.19 ; v1(-687.48,3019.04) -699.33,3007.19 ; v1(2715.19,4950.04) 2732.69,4967.54 3805.67,4967.54 3814.67,4958.54 3874.85,4958.54 3898.31,4982 4033.23,4982 v1(4048.52,4966.71) ; v1@2715.19,4955.54 ccw(c2715.19,4968.82) 2724.58,4959.43 ccw(c2733.97,4950.04) v1@2720.69,4950.04 ; v1@2715.19,4959.54 ccw(c2715.19,4982.48) 2731.41,4966.26 ccw(c2747.63,4950.04) v1@2724.69,4950.04
ATE.UIO.IO24: J33.A32 PROTOTYPE1.H23 U8.G4 UH2.8 | length 9751
  Top Layer w4: J33.A32@-785.98,2967.82 -696.48,2967.82 ; J33.A32@-706.93,2961.84 cw(c-696.48,2955.69) -696.48,2967.82 ; J33.A32@-706.93,2973.8 ccw(c-696.48,2979.96) -696.48,2967.82 ; v1@-612.19,2947.66 ccw(c-628.41,2931.44) -628.41,2954.37 ccw(c-628.41,2977.31) v1@-612.19,2961.09 ; v1@-609.36,2950.49 ccw(c-618.75,2941.1) -618.75,2954.37 ccw(c-618.75,2967.65) v1@-609.36,2958.26 ; v1(-605.48,2954.37) -683.03,2954.37 -696.48,2967.82 ; PROTOTYPE1.H23@2476.12,4208.23 2631.86,4363.97 2631.86,4771.33 ; PROTOTYPE1.H23@2476.12,4221.23 ccw(c2476.12,4252.62) 2498.31,4230.43 ccw(c2520.51,4208.23) PROTOTYPE1.H23@2489.12,4208.23 ; PROTOTYPE1.H23@2476.12,4225.23 ccw(c2476.12,4266.28) 2505.14,4237.26 ccw(c2534.16,4208.23) PROTOTYPE1.H23@2493.12,4208.23 ; PROTOTYPE1.H23@2476.12,4229.23 ccw(c2476.12,4279.93) 2511.97,4244.08 ccw(c2547.82,4208.23) PROTOTYPE1.H23@2497.12,4208.23 ; PROTOTYPE1.H23@2476.12,4233.23 ccw(c2476.12,4293.59) 2518.8,4250.91 ccw(c2561.48,4208.23) PROTOTYPE1.H23@2501.12,4208.23 ; PROTOTYPE1.H23@2476.12,4237.23 ccw(c2476.12,4307.25) 2525.63,4257.74 ccw(c2575.13,4208.23) PROTOTYPE1.H23@2505.12,4208.23 ; UH2.8@2646.33,4810.91 cw(c2596.5,4806.7) 2631.86,4771.33 ; UH2.8@2650.31,4811.25 cw(c2607.72,4807.65) 2637.95,4777.42 cw(c2668.17,4747.2) UH2.8@2671.78,4789.79 ; UH2.8@2654.3,4811.59 cw(c2618.95,4808.6) 2644.04,4783.51 cw(c2669.12,4758.42) UH2.8@2672.11,4793.78 ; UH2.8@2658.29,4811.93 cw(c2630.18,4809.55) 2650.12,4789.6 cw(c2670.07,4769.65) UH2.8@2672.45,4797.76 ; UH2.8@2671.44,4785.8 ccw(c2667.22,4735.97) 2631.86,4771.33 ; UH2.8@2673.76,4813.23 2631.86,4771.33 ; v3(4996.3,4465.59) U8.G4@5015.98,4445.91 ; U8.G4@5008.48,4445.91 ccw(c4990.38,4445.91) 5003.18,4458.71 ccw(c5015.98,4471.51) U8.G4@5015.98,4453.41 ; U8.G4@5008.64,4445.91 ccw(c4990.92,4445.91) 5003.45,4458.44 ccw(c5015.98,4470.97) U8.G4@5015.98,4453.25 ; 5009.1,4452.79 cw(c5021.91,4465.59) 5003.8,4465.59 ccw(c5021.91,4465.59) 5009.1,4452.79 ; 5009.1,4452.79 ccw(c4996.3,4439.98) 4996.3,4458.09 cw(c4996.3,4439.98) 5009.1,4452.79
  MidLayer1 w4: v1(2406.86,2883.37) 2438.52,2915.04 2438.52,4170.64 ; v1@2406.86,2888.87 ccw(c2406.86,2902.15) 2416.25,2892.76 ccw(c2425.64,2883.37) v1@2412.36,2883.37 ; v1@2406.86,2892.87 ccw(c2406.86,2915.81) 2423.07,2899.59 ccw(c2439.29,2883.37) v1@2416.36,2883.37 ; PROTOTYPE1.H23@2447.78,4202.1 cw(c2414.32,4194.85) 2438.53,4170.64 ; PROTOTYPE1.H23@2451.69,4202.94 cw(c2422.84,4196.7) 2443.71,4175.83 cw(c2464.58,4154.95) PROTOTYPE1.H23@2470.83,4183.8 ; PROTOTYPE1.H23@2455.6,4203.79 cw(c2431.37,4198.54) 2448.9,4181.01 cw(c2466.43,4163.48) PROTOTYPE1.H23@2471.68,4187.71 ; PROTOTYPE1.H23@2459.51,4204.64 cw(c2439.89,4200.39) 2454.08,4186.2 cw(c2468.27,4172) PROTOTYPE1.H23@2472.52,4191.62 ; PROTOTYPE1.H23@2469.98,4179.89 ccw(c2462.74,4146.43) 2438.53,4170.64 ; PROTOTYPE1.H23@2476.12,4208.23 2438.52,4170.64 ; v1(4615.19,4598.37) 4652.56,4598.37 4683.9,4567.04 4707.88,4567.04 4748.52,4526.39 4748.52,4475 4758.15,4465.37 4855.04,4465.37 4855.26,4465.59 4860,4465.59 4870,4465.59 4918.62,4465.59 v3(4996.3,4465.59) ; v1@4619.08,4594.49 cw(c4628.47,4585.1) 4628.47,4598.37 cw(c4628.47,4611.65) v1@4619.08,4602.26 ; v1@4621.91,4591.66 cw(c4638.13,4575.44) 4638.13,4598.37 cw(c4638.13,4621.31) v1@4621.91,4605.09 ; v3@4991.11,4460.4 ccw(c4978.57,4447.86) 4978.57,4465.59 ccw(c4978.57,4483.32) v3@4991.11,4470.78 ; 4978.19,4465.59 cw(c4978.19,4447.48) 4991,4460.29 ccw(c4978.19,4447.48) 4978.19,4465.59 ; 4978.19,4465.59 ccw(c4978.19,4483.7) 4991,4470.89 cw(c4978.19,4483.7) 4978.19,4465.59
  MidLayer2 w4: v1(-605.48,2954.37) -501.48,3058.37 186.63,3058.37 359,2886 2206.5,2886 2212.21,2891.71 2293.17,2891.71 2301.5,2883.37 v1(2406.86,2883.37) ; v1@-605.48,2959.87 ccw(c-605.48,2973.15) -596.09,2963.76 ccw(c-586.7,2954.37) v1@-599.98,2954.37 ; v1@-605.48,2963.87 ccw(c-605.48,2986.81) -589.26,2970.59 ccw(c-573.04,2954.37) v1@-595.98,2954.37 ; v1@2400.14,2876.66 ccw(c2383.92,2860.44) 2383.92,2883.37 ccw(c2383.92,2906.31) v1@2400.14,2890.09 ; v1@2402.97,2879.49 ccw(c2393.58,2870.1) 2393.58,2883.37 ccw(c2393.58,2896.65) v1@2402.97,2887.26
  Bottom Layer w4: UH2.8@2673.76,4813.23 2720.28,4766.71 ; UH2.8@2673.9,4793.71 cw(c2674.22,4747.7) 2706.76,4780.23 cw(c2739.3,4812.77) UH2.8@2693.29,4813.09 ; UH2.8@2673.87,4797.71 cw(c2674.13,4761.12) 2700,4786.99 cw(c2725.87,4812.86) UH2.8@2689.29,4813.12 ; UH2.8@2673.93,4789.71 cw(c2674.32,4734.27) 2713.52,4773.47 cw(c2752.72,4812.67) UH2.8@2697.29,4813.07 ; UH2.8@2673.95,4785.71 cw(c2674.42,4720.85) 2720.28,4766.71 ; UH2.8@2701.29,4813.04 ccw(c2766.15,4812.58) 2720.28,4766.71 ; 3316.37,4766.37 3316.71,4766.71 ; v1(4615.19,4598.37) 4631.86,4598.37 ; v1@4623.36,4593.53 cw(c4631.86,4588.51) 4631.86,4598.37 ; v1@4623.36,4603.22 ccw(c4631.86,4608.24) 4631.86,4598.37 ; 2720.28,4766.71 3316.71,4766.71 ; 3316.71,4766.71 3325.71,4775.71 4594.88,4775.71 4640.19,4730.39 4640.19,4606.71 4631.86,4598.37
ATE.UIO.IO25: J33.B32 PROTOTYPE1.H24 U8.J5 UH2.9 | length 10009.2
  Top Layer w4: v1(2598.52,4382.04) 2623.52,4407.04 2623.52,4988.73 2635.17,5000.37 2804.63,5000.37 2823.52,4981.48 2823.52,4763 UH2.9@2773.76,4713.23 ; v1@2598.52,4387.54 ccw(c2598.52,4400.82) 2607.91,4391.43 ccw(c2617.3,4382.04) v1@2604.02,4382.04 ; v1@2598.52,4391.54 ccw(c2598.52,4414.48) 2614.74,4398.26 ccw(c2630.96,4382.04) v1@2608.02,4382.04 ; UH2.9@2773.76,4728.76 ccw(c2773.76,4766.25) 2800.27,4739.74 ccw(c2826.77,4713.23) UH2.9@2789.29,4713.23 ; UH2.9@2773.76,4732.76 ccw(c2773.76,4779.91) 2807.1,4746.57 ccw(c2840.43,4713.23) UH2.9@2793.29,4713.23 ; UH2.9@2773.76,4736.76 ccw(c2773.76,4793.56) 2813.92,4753.4 ccw(c2854.08,4713.23) UH2.9@2797.29,4713.23 ; UH2.9@2773.76,4740.76 ccw(c2773.76,4807.22) 2820.75,4760.23 ccw(c2867.74,4713.23) UH2.9@2801.29,4713.23 ; v3(5035.67,4386.85) U8.J5@5055.35,4367.17 ; U8.J5@5047.85,4367.17 ccw(c5029.75,4367.17) 5042.55,4379.97 ccw(c5055.35,4392.77) U8.J5@5055.35,4374.67 ; U8.J5@5048.01,4367.17 ccw(c5030.29,4367.17) 5042.82,4379.7 ccw(c5055.35,4392.23) U8.J5@5055.35,4374.51 ; 5048.47,4374.05 ccw(c5035.67,4361.24) 5035.67,4379.35 cw(c5035.67,4361.24) 5048.47,4374.05 ; 5048.47,4374.05 cw(c5061.28,4386.85) 5043.17,4386.85 ccw(c5061.28,4386.85) 5048.47,4374.05
  MidLayer1 w4: v1(990.19,3208.37) 1123.52,3341.71 1123.52,4058.37 1131.86,4066.71 1501.71,4066.71 1520,4085 1520,4359.56 v1(1497.52,4382.04) ; v1@990.19,3213.87 ccw(c990.19,3227.15) 999.58,3217.76 ccw(c1008.97,3208.37) v1@995.69,3208.37 ; v1@990.19,3217.87 ccw(c990.19,3240.81) 1006.41,3224.59 ccw(c1022.63,3208.37) v1@999.69,3208.37 ; v1@1497.52,4372.54 cw(c1497.52,4349.61) 1513.74,4365.82 cw(c1529.96,4382.04) v1@1507.02,4382.04 ; v1@1497.52,4376.54 cw(c1497.52,4363.26) 1506.91,4372.65 cw(c1516.3,4382.04) v1@1503.02,4382.04 ; PROTOTYPE1.H24@2555.62,4228.74 ccw(c2506.11,4278.25) 2576.12,4278.25 ccw(c2646.13,4278.25) PROTOTYPE1.H24@2596.63,4228.74 ; PROTOTYPE1.H24@2558.44,4225.91 ccw(c2515.77,4268.59) 2576.12,4268.59 ccw(c2636.48,4268.59) PROTOTYPE1.H24@2593.8,4225.91 ; PROTOTYPE1.H24@2561.27,4223.08 ccw(c2525.42,4258.93) 2576.12,4258.93 ccw(c2626.82,4258.93) PROTOTYPE1.H24@2590.97,4223.08 ; PROTOTYPE1.H24@2564.1,4220.26 ccw(c2535.08,4249.28) 2576.12,4249.28 ccw(c2617.16,4249.28) PROTOTYPE1.H24@2588.14,4220.26 ; PROTOTYPE1.H24@2566.93,4217.43 ccw(c2544.74,4239.62) 2576.12,4239.62 ccw(c2607.51,4239.62) PROTOTYPE1.H24@2585.31,4217.43 ; PROTOTYPE1.H24@2576.12,4208.23 2576.12,4359.64 v1(2598.52,4382.04) ; v1@2589.02,4382.04 cw(c2566.09,4382.04) 2582.31,4365.82 cw(c2598.52,4349.61) v1@2598.52,4372.54 ; v1@2593.02,4382.04 cw(c2579.75,4382.04) 2589.14,4372.65 cw(c2598.52,4363.26) v1@2598.52,4376.54 ; v1(4310,4640) 4393.92,4640 4617.21,4416.71 4773.26,4416.71 4787.6,4402.36 4805,4402.36 4918.62,4402.36 5012.16,4402.36 cw(c5012.16,4388.31) 5022.09,4398.24 ; v1@4313.89,4636.11 cw(c4323.28,4626.72) 4323.28,4640 cw(c4323.28,4653.28) v1@4313.89,4643.89 ; v1@4316.72,4633.28 cw(c4332.93,4617.06) 4332.93,4640 cw(c4332.93,4662.93) v1@4316.72,4646.72 ; v3@5028.2,4386.2 ccw(c5010.16,4384.62) 5021.8,4398.49 ccw(c5033.44,4412.36) v3@5035.02,4394.32
  Bottom Layer w4: J33.B32@-785.98,2967.82 -697.82,2967.82 ; J33.B32@-706.6,2962.45 cw(c-697.82,2957.96) -697.82,2967.82 ; J33.B32@-706.6,2973.19 ccw(c-697.82,2977.68) -697.82,2967.82 ; v1@980.69,3208.37 ccw(c957.76,3208.37) 973.97,3224.59 ccw(c990.19,3240.81) v1@990.19,3217.87 ; v1@984.69,3208.37 ccw(c971.41,3208.37) 980.8,3217.76 ccw(c990.19,3227.15) v1@990.19,3213.87 ; v1(990.19,3208.37) 964.86,3233.71 786.29,3233.71 736.78,3184.19 -15.69,3184.19 -26.5,3195 -550,3195 -562.41,3182.59 -562.41,2947.59 -575,2935 -620,2935 -640,2955 -685,2955 -697.82,2967.82 ; v1(1497.52,4382.04) 1513.19,4366.37 2568,4366.37 2583.67,4382.04 v1(2598.52,4382.04) ; UH2.9@2773.76,4713.23 2810.52,4750 2885,4750 2898.52,4750.04 2931.86,4716.71 2931.86,4633.14 2940.29,4624.71 4294.71,4624.71 v1(4310,4640) ; UH2.9@2777.42,4732.42 ccw(c2782.11,4757.04) 2799.84,4739.31 ccw(c2817.56,4721.59) UH2.9@2792.94,4716.89 ; UH2.9@2778.17,4736.35 ccw(c2783.82,4766.01) 2805.18,4744.66 ccw(c2826.54,4723.3) UH2.9@2796.87,4717.64 ; UH2.9@2778.92,4740.27 ccw(c2785.54,4774.99) 2810.52,4750 ccw(c2835.51,4725.01) UH2.9@2800.8,4718.39
ATE.UIO.IO26: J33.A33 PROTOTYPE1.H25 U8.P7 UH2.10 | length 10166.3
  Top Layer w4: J33.A33@-785.98,2928.45 -696.55,2928.45 ; J33.A33@-706.91,2922.51 cw(c-696.55,2916.45) -696.55,2928.45 ; J33.A33@-706.92,2934.4 ccw(c-696.55,2940.45) -696.55,2928.45 ; v1(-684.81,2916.71) -696.55,2928.45 ; PROTOTYPE1.H25@2676.12,4208.23 2715.19,4247.3 ; PROTOTYPE1.H25@2679.19,4224.96 ccw(c2683.22,4246.94) 2699.02,4231.14 ccw(c2714.83,4215.33) PROTOTYPE1.H25@2692.84,4211.3 ; PROTOTYPE1.H25@2679.91,4228.89 ccw(c2684.89,4256.05) 2704.41,4236.52 ccw(c2723.94,4217) PROTOTYPE1.H25@2696.78,4212.02 ; PROTOTYPE1.H25@2680.63,4232.82 ccw(c2686.56,4265.16) 2709.8,4241.91 ccw(c2733.04,4218.67) PROTOTYPE1.H25@2700.71,4212.74 ; PROTOTYPE1.H25@2681.35,4236.76 ccw(c2688.23,4274.26) 2715.19,4247.3 ; PROTOTYPE1.H25@2704.65,4213.46 cw(c2742.15,4220.34) 2715.19,4247.3 ; UH2.10@2746.23,4813.23 cw(c2679.77,4813.23) 2726.77,4766.24 cw(c2773.76,4719.25) UH2.10@2773.76,4785.71 ; UH2.10@2750.23,4813.23 cw(c2693.43,4813.23) 2733.59,4773.07 cw(c2773.76,4732.91) UH2.10@2773.76,4789.71 ; UH2.10@2754.23,4813.23 cw(c2707.09,4813.23) 2740.42,4779.9 cw(c2773.76,4746.57) UH2.10@2773.76,4793.71 ; UH2.10@2758.23,4813.23 cw(c2720.74,4813.23) 2747.25,4786.73 cw(c2773.76,4760.22) UH2.10@2773.76,4797.71 ; UH2.10@2773.76,4813.23 2715.19,4754.66 2715.19,4247.3 ; v3(5114.41,4150.63) U8.P7@5134.09,4170.31 ; U8.P7@5126.59,4170.31 cw(c5108.49,4170.31) 5121.29,4157.51 cw(c5134.09,4144.71) U8.P7@5134.09,4162.81 ; U8.P7@5126.75,4170.31 cw(c5109.03,4170.31) 5121.56,4157.78 cw(c5134.09,4145.25) U8.P7@5134.09,4162.97 ; 5127.21,4163.43 cw(c5114.41,4176.24) 5114.41,4158.13 ccw(c5114.41,4176.24) 5127.21,4163.43 ; 5127.21,4163.43 ccw(c5140.02,4150.63) 5121.91,4150.63 cw(c5140.02,4150.63) 5127.21,4163.43
  MidLayer1 w4: v1(1841.52,3216.71) 2246.71,3216.71 2415.19,3385.19 2415.19,4390.19 2445,4420 2660,4420 2676.12,4403.88 PROTOTYPE1.H25@2676.12,4208.23 ; v1@1845.41,3212.82 cw(c1854.8,3203.43) 1854.8,3216.71 cw(c1854.8,3229.99) v1@1845.41,3220.6 ; v1@1848.24,3209.99 cw(c1864.46,3193.77) 1864.46,3216.71 cw(c1864.46,3239.64) v1@1848.24,3223.43 ; PROTOTYPE1.H25@2655.62,4228.74 ccw(c2606.11,4278.25) 2676.12,4278.25 ccw(c2746.13,4278.25) PROTOTYPE1.H25@2696.63,4228.74 ; PROTOTYPE1.H25@2658.44,4225.91 ccw(c2615.77,4268.59) 2676.12,4268.59 ccw(c2736.48,4268.59) PROTOTYPE1.H25@2693.8,4225.91 ; PROTOTYPE1.H25@2661.27,4223.08 ccw(c2625.42,4258.93) 2676.12,4258.93 ccw(c2726.82,4258.93) PROTOTYPE1.H25@2690.97,4223.08 ; PROTOTYPE1.H25@2664.1,4220.26 ccw(c2635.08,4249.28) 2676.12,4249.28 ccw(c2717.16,4249.28) PROTOTYPE1.H25@2688.14,4220.26 ; PROTOTYPE1.H25@2666.93,4217.43 ccw(c2644.74,4239.62) 2676.12,4239.62 ccw(c2707.51,4239.62) PROTOTYPE1.H25@2685.31,4217.43
  MidLayer2 w4: v1(-684.81,2916.71) -526.48,3075.04 192.59,3075.04 365.63,2902 1020.13,2902 1318.17,3200.04 1656.73,3200.04 1681.69,3225 1725,3225 1749.96,3200.04 1790.04,3200.04 1806.71,3216.71 v1(1841.52,3216.71) ; v1@-684.81,2922.21 ccw(c-684.81,2935.49) -675.42,2926.1 ccw(c-666.03,2916.71) v1@-679.31,2916.71 ; v1@-684.81,2926.21 ccw(c-684.81,2949.14) -668.59,2932.93 ccw(c-652.37,2916.71) v1@-675.31,2916.71 ; v1@1834.81,3209.99 ccw(c1818.59,3193.77) 1818.59,3216.71 ccw(c1818.59,3239.64) v1@1834.81,3223.43 ; v1@1837.64,3212.82 ccw(c1828.25,3203.43) 1828.25,3216.71 ccw(c1828.25,3229.99) v1@1837.64,3220.6 ; PROTOTYPE1.H25@2655.62,4228.74 ccw(c2606.11,4278.25) 2676.12,4278.25 ccw(c2746.13,4278.25) PROTOTYPE1.H25@2696.63,4228.74 ; PROTOTYPE1.H25@2658.44,4225.91 ccw(c2615.77,4268.59) 2676.12,4268.59 ccw(c2736.48,4268.59) PROTOTYPE1.H25@2693.8,4225.91 ; PROTOTYPE1.H25@2661.27,4223.08 ccw(c2625.42,4258.93) 2676.12,4258.93 ccw(c2726.82,4258.93) PROTOTYPE1.H25@2690.97,4223.08 ; PROTOTYPE1.H25@2664.1,4220.26 ccw(c2635.08,4249.28) 2676.12,4249.28 ccw(c2717.16,4249.28) PROTOTYPE1.H25@2688.14,4220.26 ; PROTOTYPE1.H25@2666.93,4217.43 ccw(c2644.74,4239.62) 2676.12,4239.62 ccw(c2707.51,4239.62) PROTOTYPE1.H25@2685.31,4217.43 ; PROTOTYPE1.H25@2676.12,4208.23 2676.12,4351.12 2708.71,4383.71 4074.67,4383.71 4175,4283.37 4290.19,4283.37 4306.86,4300.04 4406.86,4300.04 4581.86,4125.04 4598.52,4125.04 4640.19,4166.71 4670.19,4166.71 4695.19,4141.71 4715.19,4141.71 4740.19,4166.71 4765,4166.71 4796.59,4135.12 4855.26,4135.12 4860,4135.12 4870,4135.12 4997.36,4135.12 5090.9,4135.12 ccw(c5090.9,4149.17) 5100.83,4139.24 ; v3@5106.94,4151.28 cw(c5088.9,4152.86) 5100.54,4138.99 cw(c5112.18,4125.12) v3@5113.76,4143.16